# Altium PCB LSS-P-PCB-B v3.4.PcbDoc (part 2 of 3)
Units mil, origin at the board's own origin, x right, y up, seen from the top; angles counter-clockwise.
Board outline 2702.17 x 2795.23 mil, 4 copper layers (Top Layer, Power, GND, Bottom Layer), stack 62.08 mil thick; 111 components, 108 nets, 410 pads, 256 vias.
Unrouted connection lines stored in the file: 1.
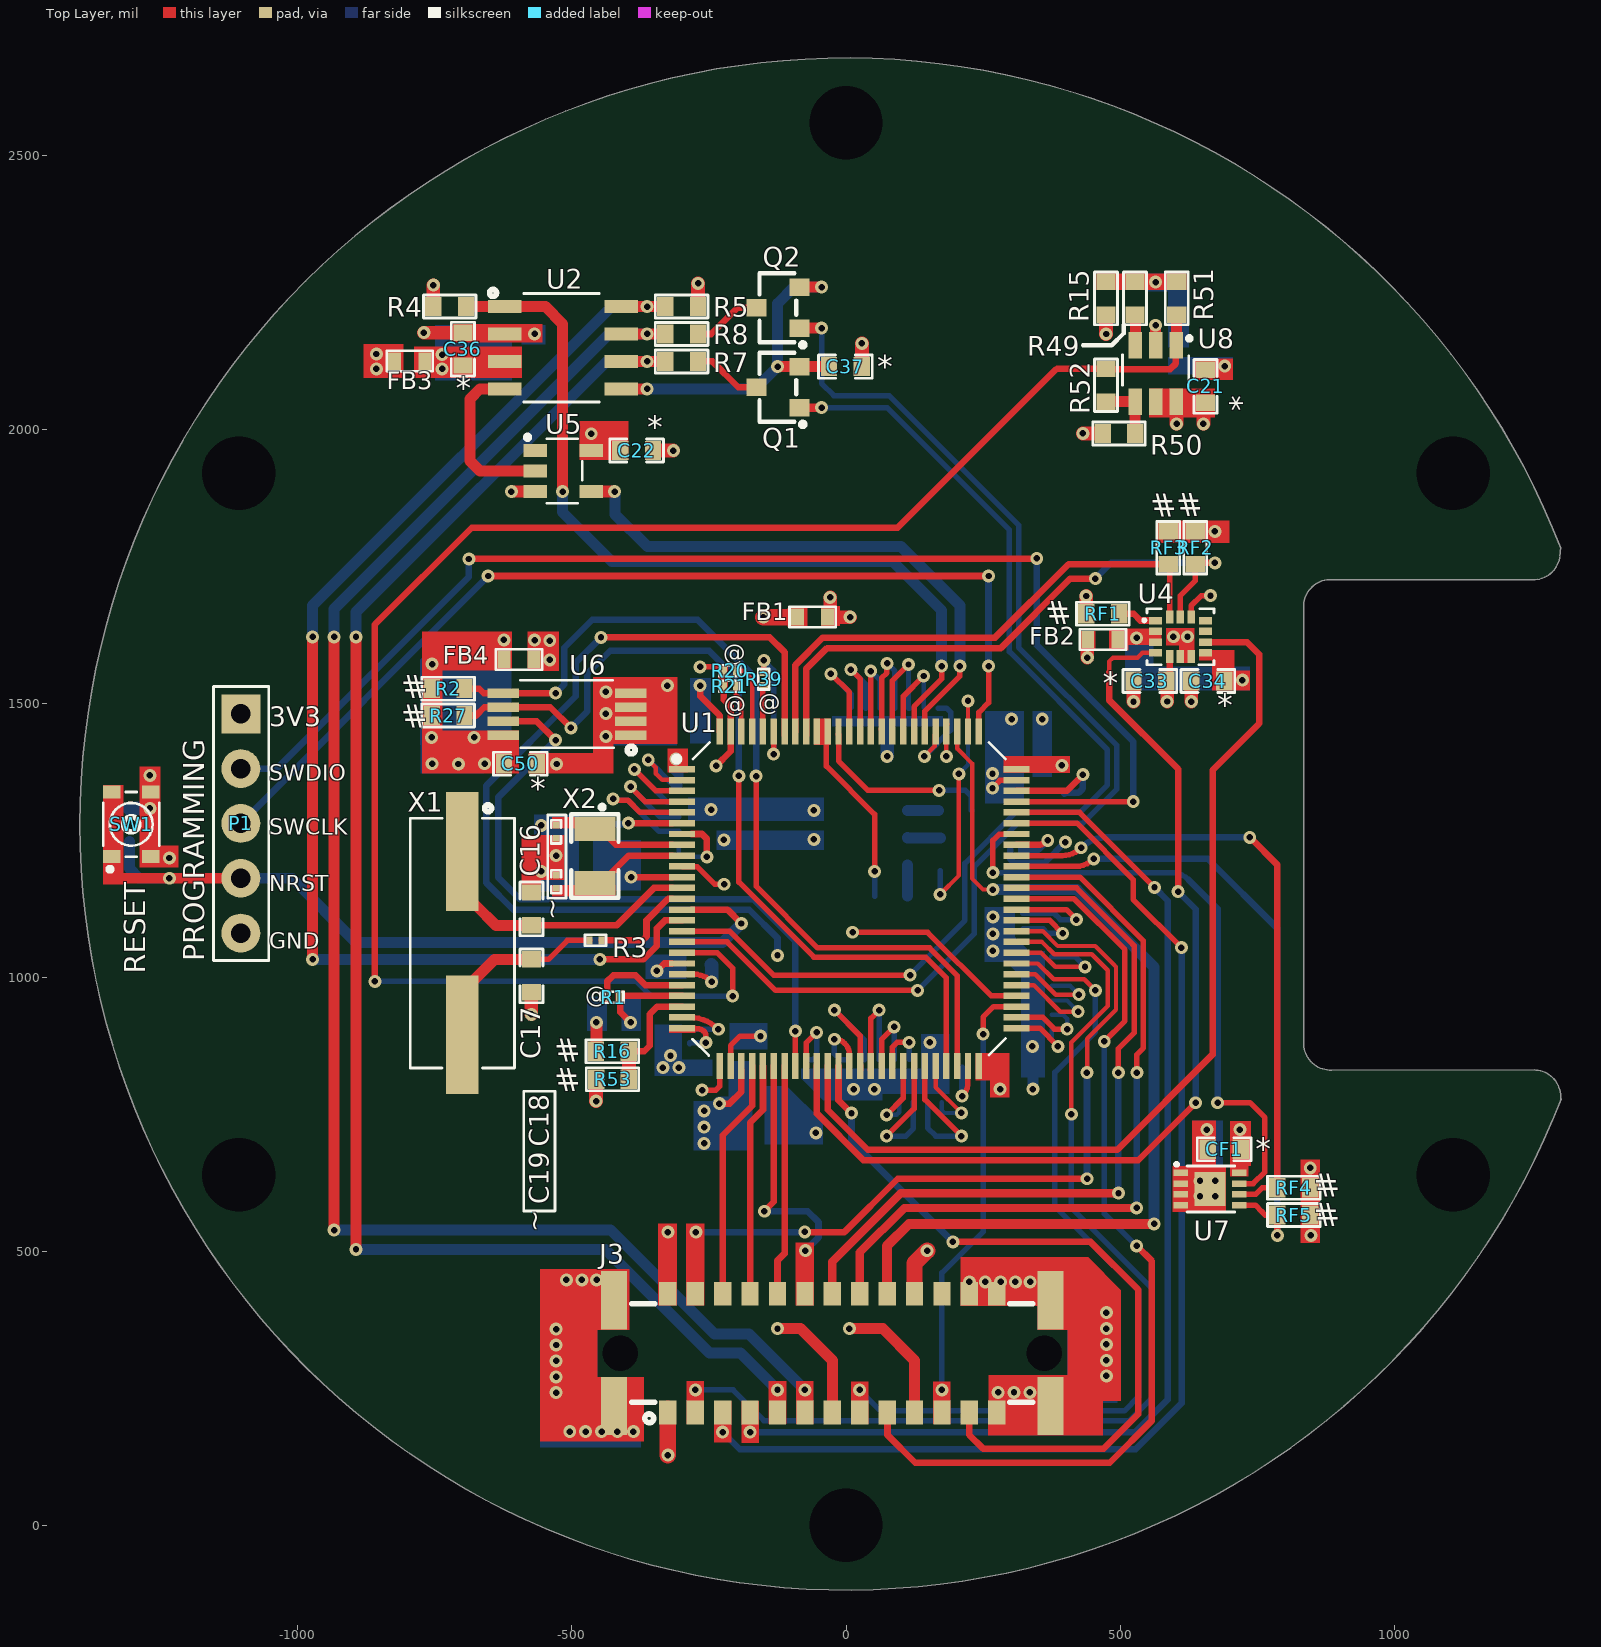
[diagram p0: Top Layer view]

## Part data (continued)
R16 R53 RF4 RF5: library part RC0603FR-0710KL, "RES SMD 10K Ohm 1% 1/10W 0603", Case Code (Imperial)=0603, Case Code (Metric)=1608, Manufacturer=Yageo, Max Operating Temperature=155°C, Max Power Dissipation=100mW, Min Operating Temperature=-55°C, Resistance=10kR, Resistance Tolerance=1%, Resistor Type="Thick Film", Supplier Part Number 1=311-10.0KHRCT-ND, Temperature Coefficient=100ppm/°C, Voltage Rating=75V, Voltage Rating (DC)=50V, Case/Package=0603, Category="Chip SMD Resistors", ComponentLink1Description=https://datasheet.ciiva.com/7660/38590-7660789.pdf?src-supplier=Element14, ComponentLink1URL=https://datasheet.ciiva.com/7660/38590-7660789.pdf?src-supplier=Element14, ComponentLink2Description=https://datasheet.ciiva.com/7983/443971-7983596.pdf?src-supplier=Element14, ComponentLink2URL=https://datasheet.ciiva.com/7983/443971-7983596.pdf?src-supplier=Element14, ComponentLink3Description=https://datasheet.ciiva.com/22747/443971-22747519.pdf?src-supplier=Element14, ComponentLink3URL=https://datasheet.ciiva.com/22747/443971-22747519.pdf?src-supplier=Element14, ComponentLink4Description=https://datasheet.ciiva.com/46440/1868787-46440891.pdf?src-supplier=Element14, ComponentLink4URL=https://datasheet.ciiva.com/46440/1868787-46440891.pdf?src-supplier=Element14, ComponentLink5Description=https://datasheet.ciiva.com/7746/1738695-7746239.pdf?src-supplier=Element14, ComponentLink5URL=https://datasheet.ciiva.com/7746/1738695-7746239.pdf?src-supplier=Element14, ComponentLink6Description=https://datasheet.ciiva.com/15189/getdatasheetpartid-409289-15189591.pdf?src-supplier=Verical, ComponentLink6URL=https://datasheet.ciiva.com/15189/getdatasheetpartid-409289-15189591.pdf?src-supplier=Verical, Construction=Rectangular, Depth=0.8mm, Features="Moisture Resistant", Height=0.45mm, Lead Free="Lead Free", Lead Pitch=0.3mm, Length=1.6mm, Manufacturer Part Number=RC0603FR-0710KL, Military Standard=Not, Number of Pins=2, Number of Terminations=2, Packaging="Tape and Reel", Power Rating=100mW, Pricing 1="1=0.10000, 10=0.02400, 100=0.00970, 1000=0.00436, 2500=0.00378 (USD)", REACH SVHC=Unknown, RoHS=Yes, RoHS Compliant=Yes, Series=RC, Size Code=0603, Stock 1=25249139, Supplier 1=Digi-Key, Termination=SMD/SMT, Tolerance=1%, Weight=7.1E-05oz, Width=0.8mm
R49: library part RC0603FR-0711KL, "RES SMD 11K, 1%, 0.1W, 0603", Case Code (Imperial)=0603, Case Code (Metric)=1608, Manufacturer=Yageo, Max Operating Temperature=155°C, Max Power Dissipation=100mW, Min Operating Temperature=-55°C, Package Quantity=1, Resistance=11kR, Resistance Tolerance=1%, Resistor Type="Thick Film", Supplier Part Number 1=311-11.0KHRCT-ND, Temperature Coefficient=100ppm/°C, Voltage Rating=50V, Working Voltage=75V, Case/Package=0603, Category="Chip SMD Resistors", ComponentLink1Description=https://datasheet.ciiva.com/2454/pyu-r-int-thick-7-2454516.pdf?src-supplier=Digi-Key, ComponentLink1URL=https://datasheet.ciiva.com/2454/pyu-r-int-thick-7-2454516.pdf?src-supplier=Digi-Key, ComponentLink2Description=https://datasheet.ciiva.com/2454/pyu-r-int-thick-7-2454517.pdf?src-supplier=Digi-Key, ComponentLink2URL=https://datasheet.ciiva.com/2454/pyu-r-int-thick-7-2454517.pdf?src-supplier=Digi-Key, ComponentLink3Description=https://datasheet.ciiva.com/2454/pyu-r-int-thick-7-2454518.pdf?src-supplier=Digi-Key, ComponentLink3URL=https://datasheet.ciiva.com/2454/pyu-r-int-thick-7-2454518.pdf?src-supplier=Digi-Key, ComponentLink4Description=https://datasheet.ciiva.com/46395/443971-46395020.pdf?src-supplier=Element14, ComponentLink4URL=https://datasheet.ciiva.com/46395/443971-46395020.pdf?src-supplier=Element14, ComponentLink5Description=https://datasheet.ciiva.com/15189/getdatasheetpartid-251835-15189597.pdf?src-supplier=Verical, ComponentLink5URL=https://datasheet.ciiva.com/15189/getdatasheetpartid-251835-15189597.pdf?src-supplier=Verical, Construction=Rectangular, Depth=0.8mm, Features="Moisture Resistant", Height=0.022inch, Lead Free="Lead Free", Length=1.6mm, Manufacturer Part Number=RC0603FR-0711KL, Military Standard=Not, Number of Pins=2, Number of Terminations=2, Packaging="Tape and Reel", Power Rating=100mW, Pricing 1="1=0.10000, 10=0.02400, 100=0.00970, 1000=0.00436, 2500=0.00378 (USD)", REACH SVHC="No SVHC", RoHS=Yes, RoHS Compliant=Yes, Series=RC, Stock 1=380174, Supplier 1=Digi-Key, Technology="THICK FILM", Termination=SMD/SMT, Tolerance=1%, Voltage Rating (DC)=50V, Width=0.031inch
R50: library part RC0603FR-0712K4L, "RES SMD 12.4K OHM 1% 1/10W 0603", Case Code (Imperial)=0603, Case Code (Metric)=1608, Manufacturer=Yageo, Max Operating Temperature=155°C, Max Power Dissipation=100mW, Min Operating Temperature=-55°C, Package Quantity=1, Resistance=12.4kR, Resistor Type="Thick Film", Supplier Part Number 1=311-12.4KHRCT-ND, Temperature Coefficient=100ppm/°C, Tolerance=1%, Voltage Rating=50V, Working Voltage=75V, Case/Package=0603, Category="Chip SMD Resistors", ComponentLink1Description=https://datasheet.ciiva.com/2454/pyu-r-int-thick-7-2454069.pdf?src-supplier=Digi-Key, ComponentLink1URL=https://datasheet.ciiva.com/2454/pyu-r-int-thick-7-2454069.pdf?src-supplier=Digi-Key, ComponentLink2Description=https://datasheet.ciiva.com/2454/pyu-r-int-thick-7-2454070.pdf?src-supplier=Digi-Key, ComponentLink2URL=https://datasheet.ciiva.com/2454/pyu-r-int-thick-7-2454070.pdf?src-supplier=Digi-Key, ComponentLink3Description=https://datasheet.ciiva.com/2454/pyu-r-int-thick-7-2454071.pdf?src-supplier=Digi-Key, ComponentLink3URL=https://datasheet.ciiva.com/2454/pyu-r-int-thick-7-2454071.pdf?src-supplier=Digi-Key, Construction=Rectangular, Depth=0.8mm, Features="Moisture Resistant", Height=0.022inch, Lead Free="Lead Free", Length=0.063inch, Manufacturer Part Number=RC0603FR-0712K4L, Military Standard=Not, Number of Terminations=2, Packaging="Tape and Reel", Power Rating=100mW, Pricing 1="1=0.10000, 10=0.02400, 100=0.00970, 1000=0.00436, 2500=0.00378 (USD)", RoHS=Yes, RoHS Compliant=Yes, Series=RC, Stock 1=494008, Supplier 1=Digi-Key, Technology="THICK FILM", Termination=SMD/SMT, Voltage Rating (DC)=50V, Width=0.031inch
R51: library part AC0603FR-0711K8L, "RES SMD 11.8K OHM 1% 1/10W 0603", Case/Package=0603, Manufacturer=Yageo, Max Operating Temperature=155°C, Max Power Dissipation=100mW, Min Operating Temperature=-55°C, Resistance=11.8kR, Resistor Type="Thick Film", Temperature Coefficient=100ppm/°C, Tolerance=1%, Category="Chip SMD Resistors", ComponentLink1Description=http://www.yageo.com/NewPortal/yageodocoutput?fileName=/pdf/R-Chip/PYu-AC_51_RoHS_L_6.pdf&src-supplier=Digi-Key, ComponentLink1URL=http://www.yageo.com/NewPortal/yageodocoutput?fileName=/pdf/R-Chip/PYu-AC_51_RoHS_L_6.pdf&src-supplier=Digi-Key, Features="Moisture Resistant,Automotive AEC-Q200", Height=0.022inch, Length=0.063inch, Manufacturer Part Number=AC0603FR-0711K8L, Number of Terminations=2, Packaging="Tape and Reel", Pricing 1="5000=0.00176, 10000=0.00174, 20000=0.00169, 30000=0.00165, 40000=0.00159, 50000=0.00155, 500000=0.00151 (USD)", RoHS=Yes, RoHS Compliant=Yes, Supplier 1=Avnet, Supplier Part Number 1=AC0603FR-0711K8L, Width=0.031inch
R52: library part RC0603FR-07105KL, "RES SMD 105K OHM 1% 1/10W 0603", Case Code (Imperial)=0603, Case Code (Metric)=1608, Manufacturer=Yageo, Max Operating Temperature=155°C, Max Power Dissipation=100mW, Min Operating Temperature=-55°C, Package Quantity=1, Resistance=105kR, Resistor Type="Thick Film", Supplier Part Number 1=311-105KHRCT-ND, Temperature Coefficient=100ppm/°C, Tolerance=1%, Voltage Rating=75V, Voltage Rating (DC)=50V, Case/Package=0603, Category="Chip SMD Resistors", ComponentLink1Description=https://datasheet.ciiva.com/11819/0900766b80f96399-11819228.pdf?src-supplier=RSComponents, ComponentLink1URL=https://datasheet.ciiva.com/11819/0900766b80f96399-11819228.pdf?src-supplier=RSComponents, ComponentLink2Description=https://datasheet.ciiva.com/2455/pyu-r-int-thick-7-2455239.pdf?src-supplier=Digi-Key, ComponentLink2URL=https://datasheet.ciiva.com/2455/pyu-r-int-thick-7-2455239.pdf?src-supplier=Digi-Key, ComponentLink3Description=https://datasheet.ciiva.com/2455/pyu-r-int-thick-7-2455240.pdf?src-supplier=Digi-Key, ComponentLink3URL=https://datasheet.ciiva.com/2455/pyu-r-int-thick-7-2455240.pdf?src-supplier=Digi-Key, ComponentLink4Description=https://datasheet.ciiva.com/2455/pyu-r-int-thick-7-2455241.pdf?src-supplier=Digi-Key, ComponentLink4URL=https://datasheet.ciiva.com/2455/pyu-r-int-thick-7-2455241.pdf?src-supplier=Digi-Key, Construction=Rectangular, Depth=0.8mm, Features="Moisture Resistant", Height=0.45mm, Lead Free="Lead Free", Length=1.6mm, Manufacturer Part Number=RC0603FR-07105KL, Military Standard=Not, Mount="Surface Mount", Number of Terminations=2, Packaging="Tape and Reel", Power Rating=100mW, Pricing 1="1=0.10000, 10=0.02400, 100=0.00970, 1000=0.00436, 2500=0.00378 (USD)", RoHS=Yes, RoHS Compliant=Yes, Series=RC, Size Code=0603, Stock 1=76313, Supplier 1=Digi-Key, Technology="THICK FILM", Termination=SMD/SMT, Weight=7.1E-05oz, Width=0.031inch
Rx1 Rx2: library part RC0603FR-07100RL, "RES SMD 100 OHM 1% 1/10W 0603", Case Code (Imperial)=0603, Case Code (Metric)=1608, Manufacturer=Yageo, Max Operating Temperature=155°C, Max Power Dissipation=100mW, Min Operating Temperature=-55°C, Resistance Tolerance=1%, Resistor Type="Thick Film", Temperature Coefficient=100ppm/°C, Voltage Rating=50V, Case/Package=0603, Category="Chip SMD Resistors", Construction=Rectangular, Depth=0.8mm, Features="Moisture Resistant", Height=0.45mm, Lead Free="Lead Free", Length=1.6mm, Manufacturer Part Number=RC0603FR-07100RL, Military Standard=Not, Number of Pins=2, Number of Terminations=2, Packaging="Tape and Reel", Power Rating=100mW, Pricing 1="5000=0.00300, 5000=0.00200, 5000=0.00450, 50000=0.00410, 500000=0.00230, 2500000=0.00140 (USD)", REACH SVHC=Unknown, Resistance=100R, RoHS=Yes, RoHS Compliant=Yes, Series=RC, Size Code=0603, Stock 1=3800000, Supplier 1="Arrow Electronics", Supplier Part Number 1=RC0603FR-07100RL, Technology="THICK FILM", Termination=SMD/SMT, Tolerance=1%, Voltage Rating (DC)=50V, Width=0.8mm
Rx3: library part RC0603FR-07470RL, "RES SMD 470 OHM 50 V, 0603 100 mW,  1%, RC Series", Case Code (Imperial)=0603, Case Code (Metric)=1608, Manufacturer=Yageo, Max Operating Temperature=155°C, Max Power Dissipation=100mW, Min Operating Temperature=-55°C, Package Quantity=1, Resistance Tolerance=1%, Resistor Type="Thick Film", Supplier Part Number 1=311-470HRCT-ND, Temperature Coefficient=100ppm/°C, Voltage Rating=50V, Working Voltage=75V, Case/Package=0603, Category="Chip SMD Resistors", ComponentLink1Description=https://datasheet.ciiva.com/11808/0900766b80f96399-11808177.pdf?src-supplier=RSComponents, ComponentLink1URL=https://datasheet.ciiva.com/11808/0900766b80f96399-11808177.pdf?src-supplier=RSComponents, ComponentLink2Description=https://datasheet.ciiva.com/7746/1738695-7746359.pdf?src-supplier=Element14, ComponentLink2URL=https://datasheet.ciiva.com/7746/1738695-7746359.pdf?src-supplier=Element14, ComponentLink3Description=https://datasheet.ciiva.com/7746/1738695-7746360.pdf?src-supplier=Element14, ComponentLink3URL=https://datasheet.ciiva.com/7746/1738695-7746360.pdf?src-supplier=Element14, ComponentLink4Description=https://datasheet.ciiva.com/7660/1868787-7660793.pdf?src-supplier=Element14, ComponentLink4URL=https://datasheet.ciiva.com/7660/1868787-7660793.pdf?src-supplier=Element14, ComponentLink5Description=https://datasheet.ciiva.com/46440/1868787-46440907.pdf?src-supplier=Element14, ComponentLink5URL=https://datasheet.ciiva.com/46440/1868787-46440907.pdf?src-supplier=Element14, ComponentLink6Description=https://datasheet.ciiva.com/2454/pyu-r-int-thick-7-2454012.pdf?src-supplier=Digi-Key, ComponentLink6URL=https://datasheet.ciiva.com/2454/pyu-r-int-thick-7-2454012.pdf?src-supplier=Digi-Key, ComponentLink7Description=https://datasheet.ciiva.com/2454/pyu-r-int-thick-7-2454013.pdf?src-supplier=Digi-Key, ComponentLink7URL=https://datasheet.ciiva.com/2454/pyu-r-int-thick-7-2454013.pdf?src-supplier=Digi-Key, ComponentLink8Description=https://datasheet.ciiva.com/2454/pyu-r-int-thick-7-2454014.pdf?src-supplier=Digi-Key, ComponentLink8URL=https://datasheet.ciiva.com/2454/pyu-r-int-thick-7-2454014.pdf?src-supplier=Digi-Key, Construction=Rectangular, Depth=0.8mm, Features="Moisture Resistant", Height=0.022inch, Lead Free="Lead Free", Length=1.6mm, Manufacturer Part Number=RC0603FR-07470RL, Military Standard=Not, Number of Terminations=2, Packaging="Tape and Reel", Power Rating=100mW, Pricing 1="1=0.10000, 10=0.02400, 100=0.00970, 1000=0.00436, 2500=0.00378 (USD)", REACH SVHC="No SVHC", Resistance=470R, RoHS=Yes, RoHS Compliant=Yes, Series=RC, Stock 1=154083, Supplier 1=Digi-Key, Technology="THICK FILM", Termination=SMD/SMT, Tolerance=1%, Width=0.031inch
SW1: "No NO J pin 50mA 3mm 100MΩ 100000 12V 250gf@±30gf 2.6mm -30℃~+85℃ 0.65mm Black Round Button Brick nogging SPST SMD Tactile Switches ROHS", Manufacturer=G-Switch, ComponentLink1Description=LCSC, ComponentLink1URL=https://www.lcsc.com/product-detail/Tactile-Switches_G-Switch-GT-TC025D-H0065-L1_C778132.html, Manufacturer Part Number=GT-TC025D-H0065-L1
U1: "IC MCU 32BIT 512KB FLASH 100LQFP", Case/Package=LQFP, Frequency=168MHz, Manufacturer=STMicroelectronics, Max Operating Temperature=85°C, Max Supply Voltage=3.6V, Min Operating Temperature=-40°C, Min Supply Voltage=1.8V, Package Quantity=90, Supplier Part Number 1=73T7121, Category=Microcontrollers, ComponentLink1Description=https://datasheet.ciiva.com/16330/dm00037051-16330920.pdf?src-supplier=Future+Electronics, ComponentLink1URL=https://datasheet.ciiva.com/16330/dm00037051-16330920.pdf?src-supplier=Future+Electronics, ComponentLink2Description=https://datasheet.ciiva.com/8055/1717982-8055038.pdf?src-supplier=Element14, ComponentLink2URL=https://datasheet.ciiva.com/8055/1717982-8055038.pdf?src-supplier=Element14, ComponentLink3Description=https://datasheet.ciiva.com/4837/dm00037051-492832-4837637.pdf?src-supplier=Mouser, ComponentLink3URL=https://datasheet.ciiva.com/4837/dm00037051-492832-4837637.pdf?src-supplier=Mouser, Core Architecture=ARM, Data Bus Width=32b, Height=1.45mm, Interface=I2C,SPI,CAN,I2S,UART,USB,Ethernet,IrDA,USART,LIN,EBI/EMI, Lead Free="Lead Free", Length=14.2mm, Manufacturer Part Number=STM32F407VET6, Max Frequency=168MHz, Memory Size=512KB, Memory Type=FLASH, Number of ADC Channels=16, Number of Ethernet Channels=1, Number of I2C Channels=3, Number of I/Os=82, Number of Pins=100, Number of Programmable I/O=82, Number of PWM Channels=2, Number of SPI Channels=3, Number of Timers/Counters=14, Number of UART Channels=2, Oscillator Type=Internal, Packaging=Tray, Peripherals="Brown-out Detect/Reset,POR,PWM,WDT,DMA,LCD,I2C", Pricing 1="1=16.05000, 10=14.76000, 25=14.15000, 50=13.31000, 100=12.47000 (USD)", Radiation Hardening=No, RAM Size=196KB, REACH SVHC="No SVHC", RoHS=Yes, RoHS Compliant=Yes, Series="STM32 F4", Supplier 1=Newark, Watchdog Timer=Yes, Width=14.2mm
U2: "IC TRANSCEIVER HALF 1/1 8SOIC", Case/Package=D, Manufacturer="Texas Instruments", Max Operating Temperature=125°C, Max Supply Current=70mA, Max Supply Voltage=5.25V, Min Operating Temperature=-40°C, Min Supply Voltage=4.75V, Operating Supply Voltage=5V, Package Quantity=2500, Category="Interface ICs", ComponentLink1Description=https://datasheet.ciiva.com/28652/1787993-28652354.pdf?src-supplier=Element14, ComponentLink1URL=https://datasheet.ciiva.com/28652/1787993-28652354.pdf?src-supplier=Element14, ComponentLink2Description=https://datasheet.ciiva.com/41461/001187135-da-01-en-ic-transcv-sn65hvda1040aqdrq1-soic-8-tid-41461891.pdf?src-supplier=Conrad, ComponentLink2URL=https://datasheet.ciiva.com/41461/001187135-da-01-en-ic-transcv-sn65hvda1040aqdrq1-soic-8-tid-41461891.pdf?src-supplier=Conrad, ComponentLink3Description=https://datasheet.ciiva.com/1766/sn65hvda1040a-q1-1766439.pdf?src-supplier=Digi-Key, ComponentLink3URL=https://datasheet.ciiva.com/1766/sn65hvda1040a-q1-1766439.pdf?src-supplier=Digi-Key, ComponentLink4Description=https://datasheet.ciiva.com/1766/sn65hvda1040a-q1-1766438.pdf?src-supplier=Digi-Key, ComponentLink4URL=https://datasheet.ciiva.com/1766/sn65hvda1040a-q1-1766438.pdf?src-supplier=Digi-Key, ComponentLink5Description=https://datasheet.ciiva.com/1766/sn65hvda1040a-q1-1766440.pdf?src-supplier=Digi-Key, ComponentLink5URL=https://datasheet.ciiva.com/1766/sn65hvda1040a-q1-1766440.pdf?src-supplier=Digi-Key, ComponentLink6Description=https://datasheet.ciiva.com/15150/getdatasheetpartid-184324-15150727.pdf?src-supplier=Verical, ComponentLink6URL=https://datasheet.ciiva.com/15150/getdatasheetpartid-184324-15150727.pdf?src-supplier=Verical, Contact Plating=Gold, Data Rate=1Mbps, Lead Free="Lead Free", Manufacturer Part Number=SN65HVDA1040AQDRQ1, Nominal Supply Current=70mA, Number of Pins=8, Number of Receive Buffers=1, Number of Transceivers=1, Number of Transmit Buffers=1, Packaging="Tape and Reel", Pricing 1="1=1.73580, 10=1.50150 (USD)", Radiation Hardening=No, REACH SVHC="No SVHC", RoHS=Yes, RoHS Compliant=Yes, Series=-, Stock 1=20, Supplier 1="Arrow Electronics", Supplier Part Number 1=SN65HVDA1040AQDRQ1, Supply Current=70mA
U3: "SENSOR ANGLE 360DEG SMD", Case/Package=SOIC, Manufacturer=Infineon, Package Quantity=2500, Supplier Part Number 1=1702338, Category="Magnetic Sensors", Interface=SPI, Manufacturer Part Number=TLE5012BE1000, Number of Pins=8, Packaging="Tape and Reel", Pricing 1="10=6.13600, 100=5.33500, 250=5.04900, 500=4.90100, 1000=4.77700 (USD)", REACH SVHC="No SVHC", RoHS=Yes, RoHS Compliant=Yes, Stock 1=1, Supplier 1=RSComponents
U4: "IMUACCEL/GYROI2C/SPI14LGA", Case/Package=LGA, LCSC Part Number=C126672, Manufacturer=STMicroelectronics, Max Operating Temperature=85°C, Min Operating Temperature=-40°C, Supplier Part Number 1=497-16705-1-ND, Category="Inertial Measurement Units (IMUs)", ComponentLink1Description=http://www.farnell.com/datasheets/2290668.pdf?src-supplier=Farnell, ComponentLink1URL=http://www.farnell.com/datasheets/2290668.pdf?src-supplier=Farnell, ComponentLink2Description=https://www.mouser.com/ds/2/389/lsm6dsl-973708.pdf?src-supplier=Mouser, ComponentLink2URL=https://www.mouser.com/ds/2/389/lsm6dsl-973708.pdf?src-supplier=Mouser, ComponentLink3Description=http://www.farnell.com/datasheets/2290668.pdf?src-supplier=Newark, ComponentLink3URL=http://www.farnell.com/datasheets/2290668.pdf?src-supplier=Newark, ComponentLink4Description=http://www.farnell.com/datasheets/2290668.pdf?src-supplier=Element14, ComponentLink4URL=http://www.farnell.com/datasheets/2290668.pdf?src-supplier=Element14, ComponentLink5Description=http://www.st.com/content/ccc/resource/technical/document/datasheet/ee/23/a0/dc/1d/68/45/52/DM00237456.pdf/files/DM00237456.pdf/jcr:content/translations/en.DM00237456.pdf?src-supplier=Digi-Key, ComponentLink5URL=http://www.st.com/content/ccc/resource/technical/document/datasheet/ee/23/a0/dc/1d/68/45/52/DM00237456.pdf/files/DM00237456.pdf/jcr:content/translations/en.DM00237456.pdf?src-supplier=Digi-Key, Item Type=IC, Manufacturer Part Number=LSM6DSLTR, Mount="Surface Mount", Output Type=SPI,I2C, Packaging="Tape and Reel", Pricing 1="1=6.37000, 10=5.72400, 25=5.41120, 100=4.68960, 250=4.44912, 500=3.99218, 1000=3.97040 (USD)", RoHS=Yes, RoHS Compliant=Yes, Sensor Type="Accelerometer,Gyroscope,3 Axis,Temperature", Stock 1=17790, Supplier 1=Digi-Key
U5: "IC BUF NON-INVERT 5.5V SOT23-5", Case/Package=SOT-23-5, High Level Output Current=-8mA, Low Level Output Current=8mA, Manufacturer="Texas Instruments", Max Operating Temperature=125°C, Max Supply Voltage=5.5V, Min Operating Temperature=-40°C, Min Supply Voltage=1.6V, Package Quantity=3000, Quiescent Current=1uA, Supplier Part Number 1=296-37176-6-ND, ComponentLink1Description=http://www.ti.com/lit/pdf/sdyu001?src-supplier=Digi-Key, ComponentLink1URL=http://www.ti.com/lit/pdf/sdyu001?src-supplier=Digi-Key, ComponentLink2Description=http://www.ti.com/lit/ds/symlink/sn74lv1t34.pdf?src-supplier=Avnet, ComponentLink2URL=http://www.ti.com/lit/ds/symlink/sn74lv1t34.pdf?src-supplier=Avnet, Lead Free="Lead Free", Logic Function=Buffer,Inverting, Manufacturer Part Number=SN74LV1T34DBVR, Mount="Surface Mount", Number of Bits=1, Number of Bits per Element=1, Number of Channels=1, Number of Elements=1, Number of Input Lines=1, Number of Inputs=1, Number of Output Lines=1, Number of Outputs=1, Number of Pins=5, Operating Supply Current=8mA, Packaging="Tape and Reel", Polarity=Non-Inverting, Pricing 1="1=0.43, 10=0.349, 25=0.3192, 100=0.2374, 250=0.2152, 500=0.17808, 1000=0.13356 (USD)", Propagation Delay=15.5ns, Radiation Hardening=No, REACH SVHC="No SVHC", RoHS Compliant=Yes, Stock 1=37360, Supplier 1=Digi-Key, Weight=0.000353oz
U6: "IC SENSOR THERMAL 3.0V 8TSSOP", Case/Package=TSSOP, Manufacturer=Microchip, Max Operating Temperature=125°C, Max Supply Voltage=3.6V, Min Operating Temperature=-40°C, Min Supply Voltage=3V, Operating Supply Current=200uA, Output Current=1uA, Package Quantity=100, Supplier Part Number 1=MCP9805-BE/ST-ND, Accuracy=2%, Category="Power Management ICs", ComponentLink1Description=https://datasheet.ciiva.com/22737/1678782-22737270.pdf?src-supplier=Element14, ComponentLink1URL=https://datasheet.ciiva.com/22737/1678782-22737270.pdf?src-supplier=Element14, ComponentLink2Description=https://datasheet.ciiva.com/43467/1678782-43467032.pdf?src-supplier=Farnell, ComponentLink2URL=https://datasheet.ciiva.com/43467/1678782-43467032.pdf?src-supplier=Farnell, ComponentLink3Description=https://datasheet.ciiva.com/22673/1678782-22673662.pdf?src-supplier=Element14, ComponentLink3URL=https://datasheet.ciiva.com/22673/1678782-22673662.pdf?src-supplier=Element14, ComponentLink4Description=https://datasheet.ciiva.com/1514/1791047-1514016.pdf?src-supplier=Element14, ComponentLink4URL=https://datasheet.ciiva.com/1514/1791047-1514016.pdf?src-supplier=Element14, ComponentLink5Description=https://datasheet.ciiva.com/2003/21977b-2003478.pdf?src-supplier=Digi-Key, ComponentLink5URL=https://datasheet.ciiva.com/2003/21977b-2003478.pdf?src-supplier=Digi-Key, ComponentLink6Description=https://datasheet.ciiva.com/5299/21977b-77986-5299688.pdf?src-supplier=Mouser, ComponentLink6URL=https://datasheet.ciiva.com/5299/21977b-77986-5299688.pdf?src-supplier=Mouser, ComponentLink7Description=https://datasheet.ciiva.com/3279/21977b-3279902.pdf?src-supplier=Avnet, ComponentLink7URL=https://datasheet.ciiva.com/3279/21977b-3279902.pdf?src-supplier=Avnet, Height=1mm, Interface=I2C,SMBus,2-Wire,Serial, Lead Free="Lead Free", Length=3mm, Manufacturer Part Number=MCP9805-BE/ST, Max Supply Voltage (DC)=3.6V, Min Supply Voltage (DC)=3V, Mount="Surface Mount", Number of Bits=10, Number of Pins=8, Output Type=I2C,Digital, Packaging=Rail/Tube, Pricing 1="1=0.85000, 25=0.71000, 100=0.65000 (USD)", Radiation Hardening=No, REACH SVHC="No SVHC", Resolution=10b, RoHS=Yes, RoHS Compliant=Yes, Sensing Method=Resistive, Sensor Type=Temperature, Stock 1=667, Supplier 1=Digi-Key, Termination=SMD/SMT, Width=4.4mm
U7: "IC EEPROM 32KBIT I2C 1MHZ 8UDFN", Frequency=100kHz, Manufacturer="ON Semiconductor", Max Frequency=1MHz, Max Operating Temperature=85°C, Max Supply Voltage=5.5V, Min Operating Temperature=-40°C, Min Supply Voltage=1.7V, Nominal Supply Current=2mA, Operating Supply Voltage=5V, Package Quantity=3000, Supplier Part Number 1=CAT24C32HU4I-GT3OSCT-ND, Access Time=3500ns, Access Time-Max=900ns, Category=EEPROM, ComponentLink1Description=https://datasheet.ciiva.com/15123/getdatasheetpartid-488928-15123672.pdf?src-supplier=Verical, ComponentLink1URL=https://datasheet.ciiva.com/15123/getdatasheetpartid-488928-15123672.pdf?src-supplier=Verical, ComponentLink2Description=https://datasheet.ciiva.com/1912/cat24c32-d-1912019.pdf?src-supplier=Digi-Key, ComponentLink2URL=https://datasheet.ciiva.com/1912/cat24c32-d-1912019.pdf?src-supplier=Digi-Key, ComponentLink3Description=https://datasheet.ciiva.com/9282/cat24c32-d-9282397.pdf?src-supplier=Avnet, ComponentLink3URL=https://datasheet.ciiva.com/9282/cat24c32-d-9282397.pdf?src-supplier=Avnet, ComponentLink4Description=https://datasheet.ciiva.com/22618/1696760-22618476.pdf?src-supplier=Element14, ComponentLink4URL=https://datasheet.ciiva.com/22618/1696760-22618476.pdf?src-supplier=Element14, Contact Plating=Gold, Density=32Kb, Halogen Free="Halogen Free", Height=0.5mm, Interface=I2C,Serial,2-Wire, Lead Free="Lead Free", Length=3.05mm, Manufacturer Part Number=CAT24C32HU4I-GT3, Memory Size=32Kb, Memory Type=EEPROM, Mount="Surface Mount", Number of Pins=8, Number of Words=4096, Organization=4KX8, Packaging="Tape and Reel", Pricing 1="1=0.47000, 10=0.45700, 25=0.42440, 50=0.42220, 100=0.37490, 250=0.37012, 500=0.36452, 1000=0.35478 (USD)", Radiation Hardening=No, REACH SVHC="No SVHC", RoHS=Yes, RoHS Compliant=Yes, Series=-, Stock 1=5701, Supplier 1=Digi-Key, Supply Current=2mA, Width=2.05mm, Write Protection=YES
U8: "IC OPAMP GP 1.7MHZ RRO SOT23-6", Case/Package=SOT-23-6, Dual Supply Voltage=2.75V, Input Bias Current=1pA, Input Offset Voltage (Vos)=5uV, Manufacturer=Maxim, Max Operating Temperature=85°C, Max Power Dissipation=696mW, Max Supply Voltage=5.5V, Min Operating Temperature=-40°C, Min Supply Voltage=2.4V, Nominal Supply Current=350uA, Output Current per Channel=30mA, Package Quantity=1, Power Supply Rejection Ratio (PSRR)=120dB, Supplier Part Number 1=MAX4236EUT+TCT-ND, Voltage Gain=128dB, Amplifier Type="GENERAL PURPOSE", Bandwidth=1.7MHz, Category="Amplifiers - Op Amps, Buffer, Instrumentation", Common Mode Rejection Ratio=102dB, ComponentLink1Description=https://datasheet.ciiva.com/26846/max4236eut-t-26846323.pdf?src-supplier=IIIC, ComponentLink1URL=https://datasheet.ciiva.com/26846/max4236eut-t-26846323.pdf?src-supplier=IIIC, ComponentLink2Description=https://datasheet.ciiva.com/1802/max4236-max4237-1802043.pdf?src-supplier=Digi-Key, ComponentLink2URL=https://datasheet.ciiva.com/1802/max4236-max4237-1802043.pdf?src-supplier=Digi-Key, ComponentLink3Description=https://datasheet.ciiva.com/14347/max4236-max4237-14347431.pdf?src-supplier=Avnet, ComponentLink3URL=https://datasheet.ciiva.com/14347/max4236-max4237-14347431.pdf?src-supplier=Avnet, ComponentLink4Description=https://datasheet.ciiva.com/1802/max4236-max4237-1802041.pdf?src-supplier=Digi-Key, ComponentLink4URL=https://datasheet.ciiva.com/1802/max4236-max4237-1802041.pdf?src-supplier=Digi-Key, ComponentLink5Description=https://datasheet.ciiva.com/1802/max4236-max4237-1802042.pdf?src-supplier=Digi-Key, ComponentLink5URL=https://datasheet.ciiva.com/1802/max4236-max4237-1802042.pdf?src-supplier=Digi-Key, ComponentLink6Description=https://datasheet.ciiva.com/17574/max4236-max4237-17574234.pdf?src-supplier=Avnet+Europe, ComponentLink6URL=https://datasheet.ciiva.com/17574/max4236-max4237-17574234.pdf?src-supplier=Avnet+Europe, Contact Plating=Tin,Matte, Gain Bandwidth Product=1.7MHz, Height=1.3mm, Length=3mm, Manufacturer Part Number=MAX4236EUT+T, Mount="Surface Mount", Number of Amplifiers=1, Number of Channels=1, Number of Circuits=1, Number of Pins=6, Operating Supply Current=350uA, Packaging="Tape and Reel", Pricing 1="1=2.31000, 10=2.07800, 25=1.96000, 100=1.66990, 250=1.56800, 500=1.47000 (USD)", Radiation Hardening=No, REACH SVHC=Unknown, RoHS=Yes, RoHS Compliant=Yes, Series=-, Slew Rate=0.3V/µs, Stock 1=5148, Supplier 1=Digi-Key, Supply Current=350uA, Supply Type=Single, Width=1.75mm
X1: library part HCM4920000000ABJT, "CRYSTAL 20.0000MHZ 18PF SMD", ESR (Equivalent Series Resistance)=50R, Frequency Tolerance=30ppm, Load Capacitance=18pF, Manufacturer=CITIZEN, Max Operating Temperature=85°C, Min Operating Temperature=-40°C, Supplier Part Number 1=300-6142-1-ND, ackage=HCM-49SMD, Category=Crystals, ComponentLink1Description=https://datasheet.ciiva.com/16207/hcm49-16207144.pdf?src-supplier=Future+Electronics, ComponentLink1URL=https://datasheet.ciiva.com/16207/hcm49-16207144.pdf?src-supplier=Future+Electronics, Crystal Type="Passive SMD Crystal", Frequency=20MHz, Lead Free="Lead Free", Manufacturer Part Number=HCM4920000000ABJT, Mount="Surface Mount", Pricing 1="1=0.60000, 10=0.50000, 50=0.45000, 100=0.40000, 500=0.38000 (USD)", RoHS=Yes, RoHS Compliant=Yes, Stock 1=172067, Supplier 1=Digi-Key
X2: "Crystals 32.768KHz 7pF", Case/Package=SMD/SMT, ESR (Equivalent Series Resistance)=70kR, Frequency=32.768kHz, Frequency Stability=10ppm, Load Capacitance=7pF, Manufacturer="ECS International", Max Operating Temperature=85°C, Min Operating Temperature=-40°C, Package Quantity=3000, Supplier Part Number 1=XC1948CT-ND, ComponentLink1Description=https://datasheet.ciiva.com/12387/ecx-31b-15952-12387920.pdf, ComponentLink1URL=https://datasheet.ciiva.com/12387/ecx-31b-15952-12387920.pdf, ComponentLink2Description=https://datasheet.ciiva.com/15047/ecx-31b-15047071.pdf, ComponentLink2URL=https://datasheet.ciiva.com/15047/ecx-31b-15047071.pdf, Frequency Tolerance=10ppm, Height=0.035inch, Lead Pitch=2.4mm, Length=0.126inch, Manufacturer Part Number=ECS-.327-7-34B-C-TR, Mount="Surface Mount", Number of Pins=2, Packaging="Tape and Reel", Pricing 1="1=0.8, 10=0.708, 50=0.6622, 100=0.5852, 500=0.5544, 1000=0.462 (USD)", Stock 1=27045, Supplier 1=Digi-Key, Termination=SMD/SMT, Width=0.061inch

## Free pads (board coordinates)
  round 118.11 hole 133.86 unplated: MH1(0,2559.06) MH2(1108.1,1919.29) MH3(1108.1,639.76) MH4(0,0) MH5(-1108.1,639.76) MH6(-1108.1,1919.29)

## Via types
v1: diameter 23.62, hole 11.81, Top Layer to Bottom Layer, tented both sides, 256 vias

## Nets (pads, with @x,y where several pads share a name; then routed paths per layer and width w, separated by ;. In a path a pad name is that pad's centre, name@x,y a point inside that pad or via, vN(x,y) a via of type N, cw(c..) or ccw(c..) an arc to the next point about the centre after c; other vN are vias at no path point)
AD0: RF1.2 U4.1 | length 70.9
  Top Layer w10: U4.1@564.34,1650.84 U4.1@564.5,1650.68
  Top Layer w12: RF1.2@498.69,1663 524.78,1663 536.95,1650.84 U4.1@564.34,1650.84
BOOT0: J3.A7 U1.94 | length 1853.8
  Top Layer w12: v1(-447,1620) -139,1620 -112.11,1593.11 U1.94@-112.11,1448.28 U1.94@-112.11,1441.28
  Top Layer w20: v1(-125,359) -83,359 -25,301 J3.A7@-25,205.99
  Bottom Layer w12: v1@-448,1618 -449,1618 -493,1574 -493,1512.65 -656,1349.65 -656,1172 -607,1123 -176.47,1123 -125,1071.53 v1(-125,1040)
BOOT1: J3.A12 U1.37 | length 1394
  Top Layer w12: U1.37@-13.69,838.04 -13.69,775.69 v1(10,752) ; v1(195,517) 446,517 533,430 533,202.87 470.13,140 250,140 225,165 J3.A12@225,205.99
  Bottom Layer w12: v1(10,752) 10,702 v1(195,517)
BUTTON: J3.A9 U1.63 | length 1728.7
  Top Layer w10: U1.63@311.12,1143.16 415.84,1143.16 508.66,1050.34 508.66,920.4 v1(471.13,882.87)
  Top Layer w12: J3.A9@75,211.12 75.63,210.48 75.63,164.79 126.42,114 481,114 558,191 558,482 v1(530,510)
  Bottom Layer w10: v1(471.13,882.87) 471.13,568.87 v1(530,510)
CAN_IN.CAN_NH#: J3.A6 R8.2 U2.7 | length 2971.7
  Top Layer w20: v1(-934,538.53) v1(-934,1621) ; U2.7@-409.7,2173.53 v1(-363,2173.53) R8.2@-330,2173.53
  Bottom Layer w20: v1(-934,538.53) -429.28,538.53 -239.8,349.05 -177.07,349.05 v1(-75,246.98) ; v1(-934,1621) -934,1672 -432.47,2173.53 v1(-363,2173.53)
CAN_IN.CAN_NL#: J3.A5 R7.2 U2.6 | length 2838
  Top Layer w20: v1(-894,503.53) v1(-894,1621) ; U2.6@-409.7,2123.53 v1(-363,2123.53) R7.2@-330,2123.53
  Bottom Layer w20: v1(-894,503.53) -438.53,503.53 -249.26,314.26 -192.28,314.26 v1(-125,246.98) ; v1(-894,1621) -894,1647 -893.94,1647.06 -893.94,1666.06 -436.47,2123.53 v1(-363,2123.53)
CAN_NH_MCU: Q2.1 U1.17 | length 2218
  Top Layer w10: U1.17@-300.45,1064.42 U1.17@-299.12,1064.42 -216.82,1064.42 -128.28,975.88 v1(130.56,975.88)
  Top Layer w20: Q2.1@-84.63,2184.13 v1(-44.4,2184.13)
  Bottom Layer w10: v1(-44.4,2184.13) -44.4,2083.41 -22.18,2061.19 78.53,2061.19 206.72,1933 207,1933 315,1825 315,1601.82 494,1422.82 494,1343 431.95,1280.95 313.95,1280.95 233.85,1200.85 233.85,1079.17 v1(130.56,975.88)
CAN_NL_MCU: Q1.1 U1.16 | length 2031.3
  Top Layer w10: U1.16@-302,1084.1 U1.16@-299.12,1084.1 -212.46,1084.1 -132.25,1003.9 v1(117.1,1003.9)
  Top Layer w15: Q1.1@-84.63,2039.13 v1(-44.4,2039.13)
  Bottom Layer w10: v1(-44.4,2039.13) 74.87,2039.13 298,1816 298,1594 477,1415 477,1351 426.64,1300.64 309.6,1300.64 216.85,1207.89 216.85,1103.65 v1(117.1,1003.9)
CAN_OUT.CAN_RX: U1.81 U5.4 | length 1038.7
  Top Layer w10: U1.81@143.8,1448.28 143.8,1485.32 207.62,1549.15 v1(207.62,1567.72)
  Top Layer w20: U5.4@-464.82,1886.13 U5.4@-464.76,1886.06
  Top Layer w22: U5.4@-464.76,1886.06 v1(-422,1886)
  Bottom Layer w20: v1(-422,1886) -421.31,1885.31 -421.31,1844.31 -362.53,1785.53 100,1785.53 207.62,1677.91 v1(207.62,1567.72)
CAN_OUT.CAN_TX: R4.1 U1.82 U2.1 | length 1537.1
  Top Layer w10: U1.82@124.11,1451.64 124.11,1493.64 174.62,1544.14 v1(174.62,1567.72)
  Top Layer w20: R4.1@-693,2223.53 U2.1@-622.3,2223.53 -548.53,2223.53 -517,2192 v1(-517,1886)
  Bottom Layer w20: v1(-517,1886) -517,1848.34 -426.66,1758 86,1758 174.62,1669.38 v1(174.62,1567.72)
CAN_OUT.STB: R5.1 U1.15 U2.8 | length 2283
  Top Layer w12: v1(-449,1032.53) -369.83,1032.53 -345,1057.35 -345,1088.93 -330.24,1103.69 -299.21,1103.69 U1.15@-299.12,1103.79
  Top Layer w20: v1(-973,1032.53) v1(-973,1621) ; U2.8@-409.7,2223.53 v1(-363,2223.53) R5.1@-330,2223.53
  Bottom Layer w20: v1(-973,1032.53) v1(-449,1032.53) ; v1(-973,1621) -973,1678 -427.47,2223.53 v1(-363,2223.53)
CAN_RX#: U2.4 U5.2 | length 310.8
  Top Layer w20: U2.4@-622.3,2073.53 -667.47,2073.53 -686,2055 -686,1942 -667.53,1923.53 U5.2@-567.18,1923.53
DIAG0_SWN: J3.B9 U1.78 | length 1738.3
  Top Layer w8: U1.78@202.85,1448.28 202.85,1417.15 230,1390 230,1180 250,1160 v1@267,1160
  Top Layer w10: v1@267,1160 v1(268,1160)
  Top Layer w18: J3.B9@75,422.53 75,510 115,550 v1(562,550)
  Bottom Layer w20: v1(268,1160) 421,1160 562,1019 v1(562,550)
DRV_DIR: J3.B8 U1.65 | length 1385.4
  Top Layer w10: U1.65@311.12,1182.53 426.47,1182.53 542.66,1066.34 542.66,871.1 530.56,859 v1(530.56,826.04)
  Top Layer w15: J3.B8@25,422.53 25,497.56 106.44,579 v1(530.19,579)
  Bottom Layer w12: v1(530.19,579) 530.37,579.18 530.37,825.12 v1@530.19,825.31
DRV_ENN: J3.B10 U1.79 | length 135
  Top Layer w8: v1(183,1403) 183,1402.33 183.17,1402.17 U1.79@183.17,1448.28
  Top Layer w30: J3.B10@125,422.53 125,478 v1(148,501)
DRV_STEP: J3.B7 U1.64 | length 1354.2
  Top Layer w10: U1.64@311.12,1162.84 420.69,1162.84 522,1061.53 522,1061.04 525.66,1057.38 525.66,898.66 496.94,869.94 v1(496.94,826.04)
  Top Layer w15: J3.B7@-25,422.53 -25,481 100,606 v1(497.13,606)
  Bottom Layer w12: v1(496.94,826.04) 497.04,825.95 497.04,606.09 v1(497.13,606)
EN_CS: Rx2.2 U1.77 | length 471.5
  Top Layer w8: v1(171.74,1151.26) 206,1185.53 v1(206,1371) ; U1.77@222.54,1448.28 v1(222.54,1504)
  Bottom Layer w8: v1(206,1371) 222.54,1387.54 v1@222.54,1503.54
  Bottom Layer w10: v1@172,1151.53 Rx2.2@172,1194
EN_DATA: Rx3.2 U1.90 U1.91 | length 343.8
  Top Layer w10: U1.91@-53.06,1448.28 -36,1431.22 -36,1385 52,1297 v1(52,1193)
  Bottom Layer w10: Rx3.2@52,1148 v1(52,1193)
EN_SCK: Rx1.2 U1.89 | length 343.9
  Top Layer w10: U1.89@-14,1443 -13.68,1442.69 -13.68,1394.69 40,1341 v1(170,1341)
  Bottom Layer w10: v1(170,1341) 218,1341 228.36,1330.64 228.36,1304.64 Rx1.2@229,1304
EVENT: U1.33 U6.7 | length 1221.6
  Top Layer w10: U1.33@-92.43,838.04 v1(-92.43,901.53)
  Top Layer w12: U6.7@-625.14,1467.05 -564.44,1467.05 v1(-529.99,1432.6)
  Bottom Layer w12: v1(-529.99,1432.6) -634.75,1327.84 -634.75,1182.28 -594.47,1142 -168.47,1142 -92.43,1065.95 v1(-92.43,901.53)
GND: C1.2 C2.2 C3.2 C4.2 C5.2 C6.2 C7.2 C8.2 C9.2 C10.2 C11.2 C12.2 C13.1 C14.1 C15.2 C16.1 C17.1 C18.1 C19.1 C20.2 C21.2 C22.2 C33.2 C34.2 C36.2 C37.2 C50.2 CF1.2 D12.2 J1.2 J3.A13 J3.B12 J3.B13 J3.MP1 J3.MP2 J3.MP3 J3.MP4 P1.5 R5.2 R6.2 R9.1 R10.1 R11.1 R12.2 R13.1 R14.1 R17.1 R18.2 R19.1 R20.1 R21.1 R22.2 R23.1 R24.2 R25.1 R26.2 R28.1 R29.2 R30.1 R31.2 R32.1 R33.2 R34.1 R35.2 R36.1 R37.2 R38.1 R39.2 R40.1 R41.2 R42.1 R43.1 R44.1 R45.2 R46.1 R47.2 R48.1 R50.2 R53.1 RF1.1 SW1.3 SW1.4 U1.10 U1.20 U1.27 U1.74 U1.99 U2.2 U3.7 U4.6 U4.7 U5.3 U6.1 U6.2 U6.3 U6.4 U7.1 U7.2 U7.3 U7.4 U7.9 U8.2 | length 2427.2
  Top Layer w10: U1.20@-299.12,1005.36 -277.26,1005.36 cw(c-277.26,959.74) -254.96,999.54 cw(c-277.26,959.74) v1@-245,992 ; U1.10@-299.12,1202.21 -298.21,1201.31 -271.08,1201.31 -239.79,1170.02 -222.66,1170.02 v1(-222.27,1169.62) ; v1(-266,1566) -225,1566 R20.1@-223,1564 ; -229,1564.44 -223.56,1559 R20.1@-222.83,1559 ; U1.27@-210.54,855.66 -210.54,875.12 -193.13,892.53 v1@-155,892.53 ; R39.2@-150,1554.83 v1(-150,1578) ; v1@266.37,1344.83 280.81,1359.27 310.69,1359.27 U1.74@311.12,1359.69
  Top Layer w12: v1(-237,1385.5) -210.37,1412.13 U1.99@-210.37,1441.28 ; R21.1@-223.51,1532.28 R21.1@-223.51,1536.01 ; R21.1@-223,1529.72 -223,1506.28 -210.54,1493.81 U1.99@-210.54,1441.28
  Top Layer w20: v1(565,2189.44) 565,2153.42 U8.2@565.4,2153.02
  Top Layer w22: v1(-610.4,1886.13) U5.3@-567.18,1886.13
  Top Layer w25: v1(-770,2176) C36.2@-699,2176 ; C36.2@-699,2173.53 U2.2@-622.3,2173.53 v1(-568,2173.53) ; v1(-574,932.27) C17.1@-574,972.53 ; C50.2@-563.53,1389 v1(-528,1389) ; v1(-456,774) R53.1@-456,814 ; C22.2@-352.19,1960.93 v1(-315,1960.93) ; R5.2@-270,2224.53 v1(-270,2266) ; C37.2@29,2115 v1(29,2156.47) ; v1(432.33,1992) R50.2@468,1992 ; RF1.1@438.23,1660 v1(438.23,1695.5) ; v1(524.5,1503) C33.2@524.5,1541.81 ; v1(630,1503) C34.2@630,1541.81 ; C21.2@656,2108 658.5,2110.5 686.5,2110.5 v1(691,2115) ; CF1.2@660,687 CF1.2@662.5,684.5
  Top Layer w30: J3.B12@225,416.62 225,458 ; J3.B13@275,422.53 275,423 276,424 364.61,424 373.23,415.38 J3.MP4@373.23,410.71
  Bottom Layer w8: -336,885 -329.19,878.19 -329.19,865 ; v1@268,1102 v1@270,1102
  Bottom Layer w10: v1(-150,1578) -132,1560 R18.2@-132,1464.83 ; R33.2@10,1469.45 R31.2@36.33,1469.45 R29.2@62.67,1469.45 R26.2@89,1469.45 R24.2@115.33,1469.45 R22.2@141.67,1469.45 R17.1@168,1469.45
  Bottom Layer w12: C3.2@289.61,1425.14 C3.2@298,1433.53 ; R45.2@299.35,1088.53 300.03,1087.84 300.03,1082.76 302.17,1080.62 302.17,1070.83 ; R14.1@299.35,1232.53 299.35,1216.03 306.38,1209 362.6,1209 v1(400.04,1246.43)
  Bottom Layer w20: v1(341,796) C4.2@341,837
  Bottom Layer w25: C15.2@-1307.5,1307.53 -1307.03,1308 v1(-1270,1308) ; -339,1441.53 -339,1531 ; C11.2@-246,1022.53 -245.18,1021.71 v1@-245.18,992 ; C5.2@-192.37,891.53 C5.2@-192,891.16 ; -132,729.53 C10.2@-132,778.53 ; U3.7@-112.01,1304.53 v1(-58.53,1304.53) ; C12.2@-86.03,727.03 C12.2@-75,716 ; v1(75,1403) 75,1463.45 ; 280.59,1095.5 294.17,1081.91 294.17,1062.83 ; C9.2@298,1381.16 C9.2@298,1384.16 298,1425.53 302,1429.53 v1(302,1471) ; J1.2@619.01,2115.39 690.61,2115.39 v1(691,2115)
  other v1: -504,171 -475,171 -446,171 -417,171 -388,171 -529,242 277.46,242.63 306.46,242.63 335.46,242.63 -529,271 475,272.63 -529,300 475,301 -529,329 475,330 -529,358 475,359 475,388 225,444 254,444 282,444 309,444 336,444 -510,448 -482,448 -455,448 645.81,600.53 674,600.53 645.81,628.53 674,628.53 -55,716 658.51,722 14,795.61 51.69,795.61 -334,835 -305,835 -320.19,857 340,874 153,881 -156,892.53 -245.18,991.53 268,1048 268,1079 268,1110 -556,1193 -1234.51,1217.51 -529,1221.66 -556,1277 -246,1305.95 267.25,1344.83 -1270,1368.11 267.25,1371.47 -438,1439.47 -438,1480.97 -438,1520.47 -326,1532 597.09,1621.15 623,1621.15
I2C.INT1: U1.35 U4.4 | length 1818
  Top Layer w8: 480,1556.31 480,1575.97 487.03,1583 531.77,1583 540.39,1591.62 U4.4@564.5,1591.62
  Top Layer w12: U1.35@-53.06,838.04 -53.06,751.1 31.84,666.21 533.21,666.21 v1(638,771) ; 480,1556.31 480,1505.77 606,1379.77 v1(606,1156)
  Bottom Layer w12: v1(606,1156) 638,1124 v1(638,771)
I2C.INT2: U1.36 U4.9 | length 1757
  Top Layer w12: U1.36@-33.37,838.04 -33.37,758.28 39.7,685.21 495.21,685.21 668.77,858.77 668.77,1377.77 754,1463 754,1589 731.69,1611.31 U4.9@655.84,1611.31
I2C.SCL: RF2.1 U1.92 U4.13 | length 1098.3
  Top Layer w10: U4.13@610.17,1656.98 610.17,1696.17 637,1723 RF2.1@637,1753.53
  Top Layer w12: U1.92@-72.74,1441.28 U1.92@-72.74,1448.28 -72.74,1562.26 -34.47,1600.53 282.53,1600.53 409.27,1727.27 v1(454.88,1727.27) ; RF2.1@638.71,1752.73 641.97,1756 v1(673,1756) v1@677,1756
  Bottom Layer w12: v1(454.88,1727.27) 483.61,1756 v1(673,1756) v1@677,1756
I2C.SDA: RF3.1 U1.93 U4.14 | length 975.4
  Top Layer w10: RF3.1@588,1753.53 590.49,1751.04 U4.14@590.49,1656.98
  Top Layer w12: U1.93@-92.43,1448.28 -92.43,1569.44 -42.34,1619.53 272.03,1619.53 406.03,1753.53 RF3.1@588,1753.53